# Altium PCB CM5_R6_Serigrafia_VIRTUS.PcbDoc (part 3 of 3)
Units mil, origin at the board's own origin, x right, y up, seen from the top; angles counter-clockwise.
Board outline 7086.61 x 4724.41 mil, 4 copper layers (Top Layer, GND L2, GND L3, Bottom Layer), stack 62.992 mil thick; 227 components, 122 nets, 905 pads, 209 vias.
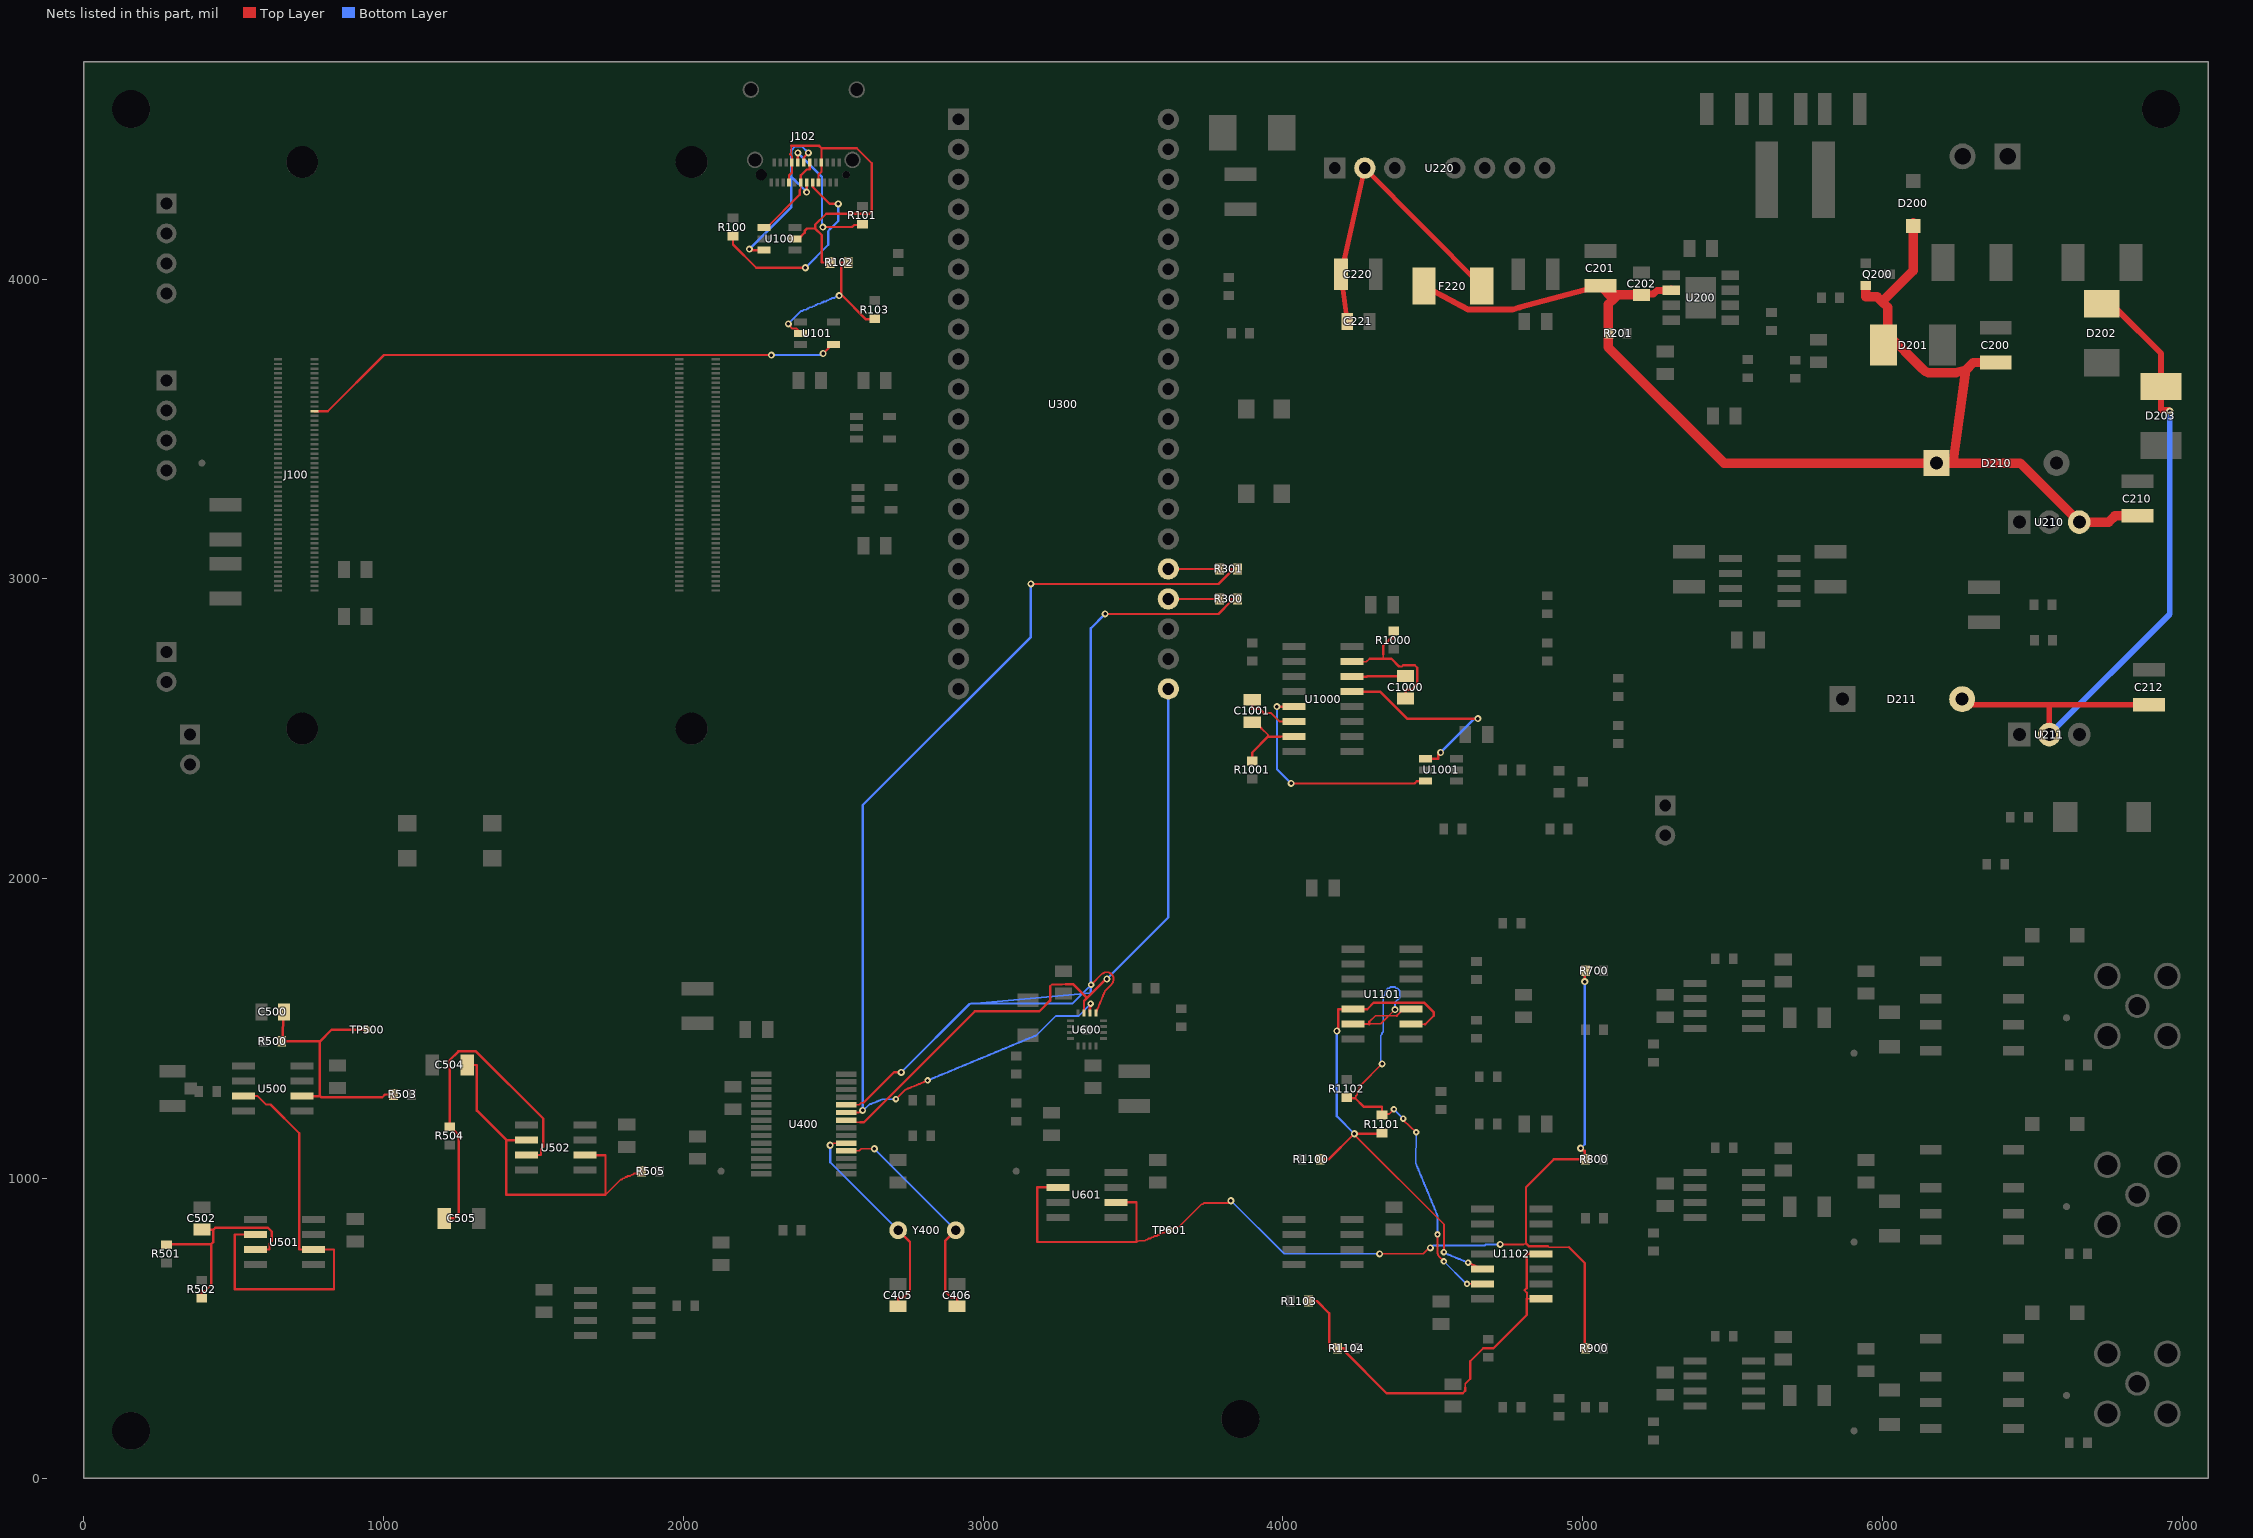
[diagram p5: the nets of this part, all layers, seen from the top]

## Via types
v1: diameter 23.62, hole 11.81, Top Layer to Bottom Layer, tented both sides, 181 vias
v2: diameter 21.65, hole 9.84, Top Layer to Bottom Layer, tented both sides, 24 vias
v3: diameter 31.5, hole 15.75, Top Layer to Bottom Layer, tented both sides, 4 vias

## Nets (pads, with @x,y where several pads share a name; then routed paths per layer and width w, separated by ;. In a path a pad name is that pad's centre, name@x,y a point inside that pad or via, vN(x,y) a via of type N, cw(c..) or ccw(c..) an arc to the next point about the centre after c; other vN are vias at no path point) (continued)
SK_B: C505.1 R504.2 U502.3 | length 1169.7
  Top Layer w5.91: U502.3@1477.36,1077.36 1524.68,1077.36 1524.68,1097.87 1532.51,1105.69
  Top Layer w7.87: C505.1@1201.77,866.14 1234.33,866.14 1250.95,882.77 1250.95,1143.73 1220.47,1174.21 1220.47,1394.46 1249.47,1423.45 1308.2,1423.45 1532.51,1199.15 1532.51,1105.69
SK_OUT: C504.2 R505.1 U502.2 U502.6 | length 1254.5
  Top Layer w5.91: 1740.16,944.88 1791.34,996.06 1795.28,996.06 1799.21,1000 1803.15,1000 1807.09,1003.94 1811.02,1003.94 1814.96,1007.87 1822.83,1007.87 1826.77,1011.81 1830.71,1011.81 1834.65,1015.75 1842.52,1015.75 1846.46,1019.68 1850.39,1019.68 R505.1@1857.28,1023.62
  Top Layer w7.87: C504.2@1278.54,1377.95 1311.1,1377.95 1311.1,1225.71 1409.45,1127.36 ; U502.2@1477.36,1127.36 1409.45,1127.36 ; U502.6@1672.24,1077.36 1740.16,1077.36 1740.16,944.88 1409.45,944.88 1409.45,1127.36
SPI_MISO: U300.21 U400.22 U600.15 | length 2243.2
  Top Layer w5.91: U400.22@2562.92,1189.88 2565.78,1187.02 2589.28,1187.02 ; 3223.5,1640.73 3229.39,1646.62 3262.74,1646.62 3264.76,1647.64 3274.61,1647.64
  Top Layer w7.87: U400.22@2543.31,1193.9 2558.91,1193.9 U400.22@2562.92,1189.88 ; 2589.28,1187.02 2602.18,1187.02 2972.52,1557.35 3188.05,1557.35 3223.5,1592.8 3223.5,1640.73 ; 3274.61,1647.64 3299.59,1647.64 3346.6,1601.63 ; U600.15@3336.61,1551.18 3336.61,1591.64 3346.6,1601.63 ; v1(3412.64,1664.81) 3409.79,1664.81 3346.6,1601.63
  Bottom Layer w7.87: v1(3412.64,1664.81) 3617.72,1869.89 U300.21@3617.72,2632.68
SPI_MOSI: R301.2 U400.23 U600.14 | length 3723.5
  Top Layer w5.91: U400.23@2543.31,1219.49 2586.69,1219.49 2593.56,1226.36 v1(2597.98,1226.36) ; v2(2708.66,1263.78) 2740.16,1295.28 2742.13,1295.28 2744.09,1297.24 2746.06,1297.24 2748.03,1299.21 2750,1299.21 2751.97,1301.18 2755.91,1301.18 2757.87,1303.15 2759.84,1303.15 2761.81,1305.12 2765.75,1305.12 2767.72,1307.09 2769.68,1307.09 2771.65,1309.06 2775.59,1309.06 2777.56,1311.02 2779.53,1311.02 2781.5,1312.99 2783.46,1312.99 2785.43,1314.96 2789.37,1314.96 2791.34,1316.93 2793.31,1316.93 2795.28,1318.9 2799.21,1318.9 2801.18,1320.87 2803.15,1320.87 2805.12,1322.83 2807.09,1322.83 2809.06,1324.8 2812.99,1324.8 v2(2814.96,1326.77) ; v2@3354.33,1576.77 3354.33,1555.12 U600.14@3356.3,1551.18 v2(3358.27,1582.68)
  Top Layer w7.87: v1(3159.29,2982.69) 3785.35,2982.69 3825.71,3023.05 3825.71,3032.68 R301.2@3851.38,3032.68
  Bottom Layer w5.91: v1(2597.98,1226.36) 2602.36,1228.35 2620.08,1246.06 2622.05,1246.06 2624.02,1248.03 2627.95,1248.03 2629.92,1250 2631.89,1250 2633.86,1251.97 2637.8,1251.97 2639.76,1253.94 2641.73,1253.94 2643.7,1255.91 2647.64,1255.91 2649.61,1257.87 2651.57,1257.87 2653.54,1259.84 2655.51,1259.84 2657.48,1261.81 2661.42,1261.81 2663.39,1263.78 v2(2708.66,1263.78) ; v2(2814.96,1326.77) 2816.93,1326.77 2818.9,1328.74 2822.83,1328.74 2824.8,1330.71 2826.77,1330.71 2828.74,1332.68 2830.71,1332.68 2832.68,1334.65 2836.61,1334.65 2838.58,1336.61 2840.55,1336.61 2842.52,1338.58 2846.46,1338.58 2848.43,1340.55 2850.39,1340.55 2852.36,1342.52 2854.33,1342.52 2856.3,1344.49 2860.24,1344.49 2862.2,1346.46 2864.17,1346.46 2866.14,1348.43 2870.08,1348.43 2872.05,1350.39 2874.02,1350.39 2875.98,1352.36 2879.92,1352.36 2881.89,1354.33 2883.86,1354.33 2885.83,1356.3 2887.8,1356.3 2889.76,1358.27 2893.7,1358.27 2895.67,1360.24 2897.64,1360.24 2899.61,1362.2 2903.54,1362.2 2905.51,1364.17 2907.48,1364.17 2909.45,1366.14 2911.42,1366.14 2913.39,1368.11 2917.32,1368.11 2919.29,1370.08 2921.26,1370.08 2923.23,1372.05 2927.17,1372.05 2929.13,1374.02 2931.1,1374.02 2933.07,1375.98 2935.04,1375.98 2937.01,1377.95 2940.94,1377.95 2942.91,1379.92 2944.88,1379.92 2946.85,1381.89 2950.79,1381.89 2952.76,1383.86 2954.72,1383.86 2956.69,1385.83 2958.66,1385.83 2960.63,1387.8 2964.57,1387.8 2966.54,1389.76 2968.5,1389.76 2970.47,1391.73 2974.41,1391.73 2976.38,1393.7 2978.35,1393.7 2980.31,1395.67 2982.28,1395.67 2984.25,1397.64 2988.19,1397.64 2990.16,1399.61 2992.13,1399.61 2994.09,1401.57 2998.03,1401.57 3000,1403.54 3001.97,1403.54 3003.94,1405.51 3007.87,1405.51 3009.84,1407.48 3011.81,1407.48 3013.78,1409.45 3015.75,1409.45 3017.72,1411.42 3021.65,1411.42 3023.62,1413.39 3025.59,1413.39 3027.56,1415.35 3031.5,1415.35 3033.46,1417.32 3035.43,1417.32 3037.4,1419.29 3039.37,1419.29 3041.34,1421.26 3045.28,1421.26 3047.24,1423.23 3049.21,1423.23 3051.18,1425.2 3055.12,1425.2 3057.09,1427.17 3059.06,1427.17 3061.02,1429.13 3062.99,1429.13 3064.96,1431.1 3068.9,1431.1 3070.87,1433.07 3072.83,1433.07 3074.8,1435.04 3078.74,1435.04 3080.71,1437.01 3082.68,1437.01 3084.65,1438.98 3086.61,1438.98 3088.58,1440.94 3092.52,1440.94 3094.49,1442.91 3096.46,1442.91 3098.43,1444.88 3102.36,1444.88 3104.33,1446.85 3106.3,1446.85 3108.27,1448.82 3110.24,1448.82 3112.2,1450.79 3116.14,1450.79 3118.11,1452.76 3120.08,1452.76 3122.05,1454.72 3125.98,1454.72 3127.95,1456.69 3129.92,1456.69 3131.89,1458.66 3135.83,1458.66 3137.8,1460.63 3139.76,1460.63 3141.73,1462.6 3143.7,1462.6 3145.67,1464.57 3149.61,1464.57 3151.57,1466.54 3153.54,1466.54 3155.51,1468.5 3159.45,1468.5 3161.42,1470.47 3163.39,1470.47 3165.35,1472.44 3167.32,1472.44 3169.29,1474.41 3173.23,1474.41 3175.2,1476.38 3177.17,1476.38 3242.13,1541.34 3318.9,1541.34 v2@3354.33,1576.77
  Bottom Layer w7.87: v1(2597.98,1226.36) 2597.98,2244.47 3159.29,2805.78 v1(3159.29,2982.69)
SPI_MOSI_RAW: R301.1 U300.25 | length 168.7
  Top Layer w7.87: U300.25@3617.72,3032.68 R301.1@3786.42,3032.68
SPI_SCLK: R300.2 U400.24 U600.13 | length 3388.8
  Top Layer w5.91: U400.24@2543.31,1245.08 2586.69,1245.08 2593.56,1251.95 2601.04,1251.95 ; v2(3360.24,1645.67) 3397.64,1683.07 3399.61,1683.07 3401.57,1685.04 3403.54,1685.04 3405.51,1687.01 3419.29,1687.01 3421.26,1685.04 3423.23,1685.04 3425.2,1683.07 3427.17,1683.07 3431.1,1679.13 3431.1,1677.17 3433.07,1675.2 3433.07,1673.23 3435.04,1671.26 3435.04,1659.45 3433.07,1657.48 3433.07,1653.54 3429.13,1649.61 3429.13,1647.64 3405.51,1624.02 3405.51,1620.08 3403.54,1618.11 3403.54,1616.14 3401.57,1614.17 3401.57,1612.2 3399.61,1610.24 3399.61,1606.3 3397.64,1604.33 3397.64,1602.36 3395.67,1600.39 3395.67,1596.46 3393.7,1594.49 3393.7,1592.52 3391.73,1590.55 3391.73,1588.58 3389.76,1586.61 3389.76,1582.68 3387.8,1580.71 3387.8,1578.74 3385.83,1576.77 3385.83,1572.83 3383.86,1570.87 3383.86,1568.9 3381.89,1566.93 3381.89,1564.96 3379.92,1562.99 3379.92,1559.06 3377.95,1557.09 3377.95,1555.12 U600.13@3375.98,1551.18
  Top Layer w7.87: 2601.04,1251.95 2702.52,1353.43 v1(2726.75,1353.43) ; v1(3406.77,2882.61) 3785.28,2882.61 3825.71,2923.05 3825.71,2932.68 R300.2@3851.38,2932.68
  Bottom Layer w5.91: 2954.79,1581.47 2958.66,1582.68 3297.24,1582.68 v2(3360.24,1645.67)
  Bottom Layer w7.87: v1(2726.75,1353.43) 2954.79,1581.47 3359.36,1618.11 3359.36,2835.2 v1(3406.77,2882.61)
SPI_SCLK_RAW: R300.1 U300.24 | length 168.7
  Top Layer w7.87: U300.24@3617.72,2932.68 R300.1@3786.42,2932.68
TIA_OUT: C500.2 R500.2 R503.1 TP500.1 U500.6 | length 888.3
  Top Layer w7.87: C500.2@667.32,1555.12 662.4,1456.69 787.4,1456.69 ; U500.6@727.36,1274.21 787.4,1274.21 ; TP500.1@944.88,1496.06 826.77,1496.06 787.4,1456.69 ; R503.1@1030.51,1279.53 1004.85,1279.53 995.69,1270.37 791.24,1270.37 787.4,1274.21 ; 787.4,1274.21 787.4,1456.69
USB_CC1: J102.A5 R100.1 | length 681.4
  Top Layer w7.87: R100.1@2165.35,4140.75 2165.35,4115.08 2242.91,4037.53 v1(2407.14,4037.53) ; J102.A5@2431.1,4322.05 2431.1,4307.91 2488.45,4250.56 v1(2516.65,4250.56)
  Bottom Layer w5.91: 2483.59,4158.53 2483.59,4160.81 2488.72,4165.94
  Bottom Layer w7.87: v1(2407.14,4037.53) 2483.59,4113.98 2483.59,4158.53 ; 2488.72,4165.94 2516.65,4193.86 v1(2516.65,4250.56)
USB_CC2: J102.B5 R101.1 | length 455.4
  Top Layer w7.87: J102.B5@2381.89,4388.98 v1(2381.89,4420.67) ; v1(2465.43,4173.3) 2562.98,4173.3 2569.81,4180.12 R101.1@2598.43,4180.12
  Bottom Layer w7.87: v1(2381.89,4420.67) 2462.47,4340.09 2462.47,4170.33 v1(2465.43,4173.3)
USB_DN_EXT: J102.A7 J102.B7 U100.1 | length 282.9
  Top Layer w5.91: 2387.81,4297.15 2391.73,4301.07 J102.A7@2391.73,4322.05
  Top Layer w7.87: U100.1@2278.05,4171.26 2387.81,4281.02 2387.81,4297.15 ; J102.A7@2391.73,4322.05 2391.73,4345.74 2411.27,4365.28 2421.26,4365.28 J102.B7@2421.26,4388.98
USB_DP_EXT: J102.A6 J102.B6 U100.3 | length 662.5
  Top Layer w7.87: v1(2220.34,4099.68) 2223.56,4096.46 2242.05,4096.46 U100.3@2278.05,4096.46 ; J102.B6@2401.57,4388.98 2401.57,4405.01 v1(2417.19,4420.62) ; v1(2411.42,4290.11) J102.A6@2411.42,4322.05
  Bottom Layer w7.87: v1(2220.34,4099.68) 2359.35,4238.7 2359.35,4342.18 ; v1(2411.42,4290.11) 2359.35,4342.18 ; v1(2417.19,4420.62) 2394.81,4443 2373.41,4443 2359.35,4428.95 2359.35,4342.18
USB_VBUS: J102.A4 J102.A9 J102.B4 J102.B9 R102.1 U100.5 | length 1158
  Top Layer w5.91: 2356.18,4417.15 2360.22,4421.19 2360.22,4444.03 ; 2358.28,4413.64 2362.2,4409.72 J102.B4@2362.2,4388.98
  Top Layer w7.87: J102.A9@2352.36,4322.05 2352.36,4345.74 2362.2,4355.59 2362.2,4365.28 J102.B4@2362.2,4388.98 ; 2356.18,4417.15 2358.28,4415.04 2358.28,4413.64 ; 2360.22,4444.03 2452.79,4444.03 2460.63,4436.19 ; U100.5@2367.62,4133.86 2383.76,4133.86 2404.45,4154.55 2404.45,4160.29 2412.57,4168.41 2439.58,4168.41 ; J102.A4@2450.79,4322.05 2450.79,4348.11 2460.63,4357.96 J102.B9@2460.63,4388.98 2460.63,4412.67 2460.63,4436.19 ; R102.1@2487.2,4055.12 2461.54,4055.12 2461.54,4146.45 2439.58,4168.41 ; 2439.58,4168.41 2439.58,4180.79 2476.71,4217.92 2619.77,4217.92 2628.45,4226.6 2628.45,4386.04 2578.3,4436.19 2460.63,4436.19
USB_VBUS_OK: J100.24 U101.4 | length 1814.8
  Top Layer w7.87: J100.24@769.29,3559.05 813.9,3559.06 1001.22,3746.38 v1(2293.57,3746.38) ; v1(2466.4,3751.5) 2485.73,3770.83 U101.4@2485.73,3781.5
  Bottom Layer w7.87: v1(2293.57,3746.38) 2461.27,3746.38 v1(2466.4,3751.5)
USB_VS_IN: R102.2 R103.1 U101.2 | length 547.4
  Top Layer w5.91: v1(2350.39,3850.39) 2358.27,3842.52 2358.27,3838.58 2362.2,3834.65 2377.95,3834.65 U101.2@2389.76,3822.83 ; v1(2519.68,3944.88) v1@2526.5,3947.83
  Top Layer w7.87: R102.2@2552.17,4055.12 2526.5,4055.12 2526.5,3947.83 2609.18,3865.16 R103.1@2637.8,3865.16
  Bottom Layer w5.91: v1(2350.39,3850.39) 2393.7,3893.7 2397.64,3893.7 2401.57,3897.64 2409.45,3897.64 2413.39,3901.57 2417.32,3901.57 2421.26,3905.51 2429.13,3905.51 2433.07,3909.45 2437.01,3909.45 2440.94,3913.39 2444.88,3913.39 2448.82,3917.32 2456.69,3917.32 2460.63,3921.26 2464.57,3921.26 2468.5,3925.2 2476.38,3925.2 2480.31,3929.13 2484.25,3929.13 2488.19,3933.07 2492.13,3933.07 2496.06,3937.01 2503.94,3937.01 2507.87,3940.94 2511.81,3940.94 2515.75,3944.88 v1(2519.68,3944.88)
VDARK: U500.3 U501.2 U501.6 | length 1455.1
  Top Layer w5.91: U500.3@532.48,1274.21 579.8,1274.21 608.13,1245.88 623.02,1245.88
  Top Layer w7.87: U501.2@571.85,812.4 503.94,812.4 503.94,629.92 834.65,629.92 834.65,762.4 U501.6@766.73,762.4 718.43,762.4 718.43,1150.47 623.02,1245.88
VDARK_DIV: C502.1 R501.2 R502.1 U501.3 | length 754
  Top Layer w5.91: U501.3@571.85,762.4 619.17,762.4 619.17,782.91 627,790.73
  Top Layer w7.87: R501.2@275.59,780.51 304.21,780.51 424.95,780.51 ; R502.1@393.7,597.44 393.7,623.11 403.33,623.11 424.95,644.72 424.95,780.51 ; C502.1@393.7,828.74 432.16,828.74 ; 627,790.73 627,822.28 614.04,835.24 438.66,835.24 432.16,828.74 ; 424.95,780.51 432.16,787.72 432.16,828.74
VHI: R1100.2 R1101.1 U1101.5 U1101.9 U1102.5 | length 1790.5
  Top Layer w5.91: v1(4238.27,1148.62) 4240.16,1143.7 4537.4,846.46 v2(4537.4,753.94) ; U1101.9@4428.15,1514.17 4472.48,1514.17 ; 4475.47,1514.17 4503.78,1542.5 ; v2(4618.11,718.5) 4620.08,716.54 4624.02,716.54 4625.98,714.57 4627.95,714.57 4629.92,712.6 4631.89,712.6 4633.86,710.63 4637.8,710.63 4639.76,708.66 4641.73,708.66 4643.7,706.69 4647.64,706.69 4649.61,704.72 4651.57,704.72 4653.54,702.76 4655.51,702.76 4657.48,700.79 4661.42,700.79 4663.39,698.82 U1102.5@4666.34,698.03
  Top Layer w7.87: R1100.2@4126.97,1062.99 4152.64,1062.99 v1(4238.27,1148.62) R1101.1@4330.71,1148.62 ; v1(4180,1491.32) 4184.96,1496.28 4184.96,1564.17 U1101.5@4233.27,1564.17 4281.57,1564.17 4303.31,1585.91 4471.18,1585.91 4503.78,1553.31 4503.78,1542.5 ; 4472.48,1514.17 4475.47,1514.17
  Bottom Layer w5.91: v2(4537.4,753.94) 4541.34,750 4543.31,750 4545.28,748.03 4547.24,748.03 4549.21,746.06 4551.18,746.06 4553.15,744.09 4557.09,744.09 4559.06,742.13 4561.02,742.13 4562.99,740.16 4566.93,740.16 4568.9,738.19 4570.87,738.19 4572.83,736.22 4574.8,736.22 4576.77,734.25 4580.71,734.25 4582.68,732.28 4584.65,732.28 4586.61,730.31 4590.55,730.31 4592.52,728.35 4594.49,728.35 4596.46,726.38 4600.39,726.38 4602.36,724.41 4604.33,724.41 4606.3,722.44 4608.27,722.44 4610.24,720.47 4614.17,720.47 4616.14,718.5 v2(4618.11,718.5)
  Bottom Layer w7.87: v1(4180,1491.32) 4180,1206.89 v1(4238.27,1148.62)
VIN_DC: C220.1 C221.1 F220.2 U220.2 | length 1076.3
  Top Layer w15.75: C221.1@4214.57,3858.27 C220.1@4193.9,4015.75 U220.2@4273.23,4370.08 F220.2@4663.58,3976.38
VIN_N: C212.1 D202.2 D203.2 D211.2 U211.2 | length 2453.5
  Top Layer w19.68: D211.2@6266.14,2598.43 6284.84,2579.72 6556.69,2579.72 ; U211.2@6556.69,2480.31 6556.69,2579.72 ; D202.2@6732.28,3897.64 6783.54,3897.64 6929.13,3752.04 6929.13,3627.95 6929.13,3562.92 6955.12,3562.92 v1(6958.5,3559.53) ; C212.1@6889.76,2579.72 6556.69,2579.72
  Bottom Layer w19.68: U211.2@6556.69,2480.31 6958.5,2882.12 v1(6958.5,3559.53)
VIN_P: C200.1 C201.1 C202.1 C210.1 D200.1 D201.1 D210.1 F220.1 Q200.2 R201.1 U200.2 U210.3 | length 4418.9
  Top Layer w19.68: F220.1@4470.28,3976.38 4619.88,3897.64 4765.55,3897.64 4789.17,3905.51 C201.1@5059.06,3977.36
  Top Layer w23.62: C202.1@5196.85,3949.46 5235.43,3949.46 5247.95,3962.01 U200.2@5295.37,3962.01
  Top Layer w31.5: C201.1@5059.06,3977.36 5103.15,3933.26 ; C202.1@5196.85,3949.46 C202.1@5196.85,3946.85 5116.73,3946.85 5103.15,3933.26 ; Q200.2@5944.88,3978.35 5944.88,3940.87 5982.36,3940.87 5999.02,3924.21 ; D201.1@6017.72,3779.53 D201.1@6017.72,3815.85 ; D200.1@6102.36,4187.01 6102.36,4027.55 5999.02,3924.21 ; C200.1@6377.95,3721.46 6303.07,3721.46 6278.43,3696.81 ; C210.1@6850.39,3209.65 6775.51,3209.65 6754.84,3188.98 U210.3@6656.69,3188.98 6459.84,3385.83 6235.67,3385.83 ; 5103.15,3933.26 5085.63,3915.74 5085.63,3818.9 5085.63,3771.72 5471.54,3385.83 D210.1@6181.1,3385.83 ; 5999.02,3924.21 6017.72,3905.51 6017.72,3846.53 D201.1@6017.72,3815.85 ; D201.1@6017.72,3815.85 6128.74,3704.83 6142.52,3691.89 6153.35,3687.95 6245.87,3687.95 6278.43,3696.81 ; D210.1@6181.1,3385.83 6235.67,3385.83 ; D210.1@6181.1,3385.83 6235.67,3385.83 ; 6235.67,3385.83 6278.43,3696.81
VLO: R1101.2 R1102.1 U1101.6 U1101.10 U1102.6 | length 1850.4
  Top Layer w5.91: 4241.22,1266.73 4244.09,1275.59 4248.03,1279.53 4248.03,1287.4 4251.97,1291.34 4251.97,1295.28 4255.91,1299.21 4255.91,1303.15 4259.84,1307.09 4259.84,1311.02 v1(4330.71,1381.89) ; 4288.03,1514.17 4280.59,1514.17 U1101.6@4233.27,1514.17 4240.16,1515.75 4326.77,1515.75 v1(4374.02,1562.99) ; 4288.03,1521.62 4308.9,1542.5 4379.92,1542.5 ; R1101.2@4330.71,1213.58 4334.65,1214.57 4354.33,1214.57 v2(4370.08,1230.31) ; v2(4401.57,1198.82) 4401.57,1192.91 v2(4444.88,1153.54) ; v2(4515.75,812.99) 4515.75,748.03 4517.72,746.06 4517.72,744.09 4519.69,742.13 4519.69,740.16 v2(4537.4,722.44) ; v2(4614.17,648.03) U1102.6@4666.34,648.03
  Top Layer w7.87: R1102.1@4212.6,1266.73 4241.22,1266.73 4268.7,1239.25 4330.71,1239.25 R1101.2@4330.71,1213.58 ; 4288.03,1514.17 4288.03,1521.62 ; 4379.92,1542.5 4401.57,1564.17 U1101.10@4428.15,1564.17
  Bottom Layer w5.91: v1(4330.71,1381.89) 4326.77,1385.83 4326.77,1476.38 4330.71,1480.31 4330.71,1484.25 4334.65,1488.19 4334.65,1606.3 4342.52,1614.17 4342.52,1622.05 4346.46,1625.98 4346.46,1629.92 4350.39,1633.86 4354.33,1633.86 4358.27,1637.8 4374.02,1637.8 4377.95,1633.86 4381.89,1633.86 4389.76,1625.98 4389.76,1602.36 4374.02,1586.61 v1(4374.02,1562.99) ; v2(4370.08,1230.31) v2(4401.57,1198.82) ; v2(4444.88,1153.54) 4442.91,1049.21 4444.88,1047.24 4444.88,1045.28 4446.85,1043.31 4446.85,1039.37 4448.82,1037.4 4448.82,1035.43 4450.79,1033.46 4450.79,1031.5 4452.76,1029.53 4452.76,1025.59 4454.72,1023.62 4454.72,1021.65 4456.69,1019.68 4456.69,1015.75 4458.66,1013.78 4458.66,1011.81 4460.63,1009.84 4460.63,1007.87 4462.6,1005.91 4462.6,1001.97 4464.57,1000 4464.57,998.03 4466.54,996.06 4466.54,992.13 4468.5,990.16 4468.5,988.19 4470.47,986.22 4470.47,982.28 4472.44,980.31 4472.44,978.35 4474.41,976.38 4474.41,974.41 4476.38,972.44 4476.38,968.5 4478.35,966.54 4478.35,964.57 4480.31,962.6 4480.31,958.66 4482.28,956.69 4482.28,954.72 4484.25,952.76 4484.25,950.79 4486.22,948.82 4486.22,944.88 4488.19,942.91 4488.19,940.94 4490.16,938.98 4490.16,935.04 4492.13,933.07 4492.13,931.1 4494.09,929.13 4494.09,927.17 4496.06,925.2 4496.06,921.26 4498.03,919.29 4498.03,917.32 4500,915.35 4500,911.42 4501.97,909.45 4501.97,907.48 4503.94,905.51 4503.94,903.54 4505.91,901.57 4505.91,897.64 4507.87,895.67 4507.87,893.7 4509.84,891.73 4509.84,887.8 4511.81,885.83 4511.81,883.86 4513.78,881.89 4513.78,877.95 4515.75,875.98 v2(4515.75,812.99) ; v2(4537.4,722.44) 4608.27,651.57 v2(4614.17,648.03)
VMID_DAC: R700.1 R800.1 R900.1 TP601.1 U601.2 U601.6 | length 3795.9
  Top Layer w5.91: 3511.81,787.4 3519.68,791.34 3539.37,791.34 3543.31,795.28 3547.24,795.28 3551.18,799.21 3559.06,799.21 3562.99,803.15 3566.93,803.15 3570.87,807.09 3578.74,807.09 3582.68,811.02 3586.61,811.02 3590.55,814.96 3594.49,814.96 3598.43,818.9 3606.3,818.9 3610.24,822.83 3614.17,822.83 TP601.1@3622.05,826.77 3629.92,830.71 3633.86,830.71 3637.8,834.65 3645.67,834.65 3649.61,838.58 3653.54,838.58 3728.35,913.39 3732.28,913.39 3736.22,917.32 3818.9,917.32 v1(3826.77,925.2) ; v1(4322.83,748.03) 4468.5,748.03 4488.19,767.72 v1(4492.13,767.72) ; v1(4724.41,779.53) 4803.15,779.53 4810.83,782.76 ; 4884.53,773.03 4887.83,769.68 4954.41,769.68
  Top Layer w7.87: U601.2@3249.02,969.88 3181.1,969.88 3181.1,787.4 3511.81,787.4 3511.81,919.88 U601.6@3443.9,919.88 ; 4884.53,773.03 4820.55,773.03 4810.83,782.76 4810.83,970.1 4903.74,1062.99 5006.89,1062.99 5006.89,1091.61 5001.84,1091.61 v1(4993.31,1100.13) ; 4954.41,769.68 5006.89,717.24 R900.1@5006.89,433.07 ; v1(5006.89,1655.97) R700.1@5006.89,1692.91
  Bottom Layer w5.91: v1(3826.77,925.2) 4003.94,748.03 v1(4322.83,748.03) ; v1(4492.13,767.72) 4500,775.59 4673.23,775.59 4677.17,779.53 v1(4724.41,779.53)
  Bottom Layer w7.87: v1(4993.31,1100.13) 5006.89,1113.71 v1(5006.89,1655.97)
VRAIL: R1103.2 R1104.1 U1102.8 U1102.11 | length 1388.4
  Top Layer w5.91: 4608.19,301.3 4608.19,315.08 4624.92,331.85 ; 4806.06,626.38 4813.9,618.54 4813.9,598.03 U1102.8@4861.22,598.03
  Top Layer w7.87: R1103.2@4087.6,590.55 4113.27,590.55 4154.45,549.37 4154.45,433.07 4180.12,433.07 4205.79,433.07 4205.79,423.46 4346.14,283.11 4599.72,283.11 4608.19,291.54 4608.19,301.3 ; 4624.92,331.85 4624.92,389.49 4668.5,433.07 4702.32,433.07 4813.9,544.65 4813.9,598.03 ; 4806.06,626.38 4812.91,633.19 4812.91,748.03 U1102.11@4861.22,748.03
WD_C1: C1000.2 U1000.14 | length 178.9
  Top Layer w7.87: U1000.14@4231.3,2673.43 4279.61,2673.43 4281.38,2675.2 C1000.2@4409.45,2675.2
WD_C2: C1001.2 U1000.6 | length 186.4
  Top Layer w5.91: 3936.04,2551.76 3960.79,2551.76 3989.09,2523.43 U1000.6@4036.42,2523.43
  Top Layer w7.87: C1001.2@3897.64,2596.46 3897.64,2566.85 3920.94,2566.85 3936.04,2551.76
WD_CM5: U1000.5 U1001.3 | length 790.4
  Top Layer w7.87: v1(3980.24,2573.43) 3988.11,2573.43 U1000.5@4036.42,2573.43 ; v1(4027.64,2317.17) 4439.13,2317.17 4446.77,2324.8 U1001.3@4482.76,2324.8
  Bottom Layer w7.87: v1(3980.24,2573.43) 3980.24,2364.61 v1(4027.64,2317.17)
WD_MCU: U1000.13 U1001.1 | length 687
  Top Layer w7.87: U1000.13@4231.3,2623.43 4324.17,2623.43 4414.13,2533.46 v1(4650.24,2533.46) ; U1001.1@4482.76,2399.61 4518.78,2399.61 4518.78,2413.09 v1(4526.18,2420.48)
  Bottom Layer w7.87: v1(4526.18,2420.48) 4639.13,2533.46 v1(4650.24,2533.46)
WD_R1: C1000.1 R1000.2 U1000.15 | length 480.9
  Top Layer w5.91: U1000.15@4231.3,2723.43 4278.62,2723.43 4288.94,2733.76 ; 4334.61,2733.76 4334.61,2747.82 ; 4387.72,2707.6 4397.48,2707.6 4401.5,2711.64
  Top Layer w7.87: 4288.94,2733.76 4334.61,2733.76 4361.54,2733.76 4387.72,2707.6 ; 4334.61,2747.82 4334.61,2776.26 4360.47,2802.09 4370.08,2802.09 R1000.2@4370.08,2827.76 ; 4401.5,2711.64 4439.69,2711.64 4447.91,2703.4 4447.91,2649.96 4427.95,2630 4409.45,2630 C1000.1@4409.45,2600.39
WD_R2: C1001.1 R1001.2 U1000.7 | length 262.7
  Top Layer w5.91: 3927.87,2501.76 3950.71,2478.91 3950.71,2473.43 ; 3992.09,2473.43 U1000.7@4036.42,2473.43
  Top Layer w7.87: R1001.2@3897.64,2394.68 3897.64,2420.35 3950.71,2473.43 3992.09,2473.43 ; C1001.1@3897.64,2521.65 3907.97,2521.65 3927.87,2501.76
XTAL1: C405.1 U400.19 Y400.1 | length 731.3
  Top Layer w5.91: v1(2489.81,1110.25) 2493.05,1110.25 2499.93,1117.13 U400.19@2543.31,1117.13
  Top Layer w7.87: C405.1@2716.54,572.83 2716.54,602.44 2735.04,602.44 2756.14,623.54 2756.14,787.17 Y400.1@2716.54,826.77
  Bottom Layer w7.87: v1(2489.81,1110.25) 2489.81,1053.49 Y400.1@2716.54,826.77
XTAL2: C406.1 U400.18 Y400.2 | length 776.8
  Top Layer w5.91: U400.18@2543.31,1091.54 2586.69,1091.54 2593.56,1098.41 v1(2637.02,1098.41)
  Top Layer w7.87: Y400.2@2908.66,826.77 2873.19,791.3 2873.19,624.13 2894.89,602.44 2913.39,602.44 C406.1@2913.39,572.83
  Bottom Layer w7.87: v1(2637.02,1098.41) Y400.2@2908.66,826.77
pads on no net: H1. H2. H3. H4. H5. H6. H7. H8. J100.3 J100.4 J100.5 J100.6 J100.9 J100.10 J100.11 J100.12 J100.15 J100.17 J100.18 J100.20 J100.25 J100.26 J100.27 J100.28 J100.29 J100.30 J100.31 J100.34 J100.35 J100.36 J100.37 J100.38 J100.39 J100.40 J100.41 J100.44 J100.45 J100.46 J100.47 J100.48 J100.49 J100.57 J100.61 J100.62 J100.63 J100.64 J100.67 J100.68 J100.69 J100.70 J100.72 J100.73 J100.75 J100.76 J100.80 J100.82 J100.88 J100.89 J100.90 J100.91 J100.94 J100.95 J100.96 J100.97 J100.100 J101.1 J101.2 J101.4 J101.6 J101.9 J101.10 J101.11 J101.12 J101.15 J101.16 J101.17 J101.18 J101.21 J101.22 J101.23 J101.24 J101.27 J101.28 J101.29 J101.30 J101.33 J101.34 J101.35 J101.36 J101.39 J101.40 J101.41 J101.42 J101.43 J101.45 J101.46 J101.47 J101.48 J101.49 J101.51 J101.52 J101.53 J101.54 J101.57 J101.58 J101.59 J101.60 J101.63 J101.64 J101.65 J101.66 J101.69 J101.70 J101.71 J101.72 J101.75 J101.76 J101.77 J101.78 J101.81 J101.82 J101.83 J101.84 J101.87 J101.88 J101.89 J101.90 J101.93 J101.94 J101.95 J101.96 J101.99 J101.100 J102. J102.A2 J102.A3 J102.A8 J102.A10 J102.A11 J102.B2 J102.B3 J102.B8 J102.B10 J102.B11 K700.5 K700.6 K700.7 K800.5 K800.6 K800.7 K900.5 K900.6 K900.7 U101.1 U220.3 U220.5 U220.8 U300.11 U300.12 U300.14 U300.15 U300.16 U300.17 U300.19 U300.20 U300.31 U300.32 U300.34 U300.35 U300.37 U300.40 U301.1 U302.1 U400.10 U400.11 U400.12 U400.13 U400.25 U400.26 U400.27 U400.28 U401.1 U401.3 U401.5 U401.7 U401.8 U500.1 U500.5 U500.8 U501.1 U501.5 U501.8 U502.1 U502.5 U502.8 U601.1 U601.5 U601.8 U700.1 U700.5 U700.8 U800.1 U800.5 U800.8 U900.1 U900.5 U900.8 U1000.4 U1000.12 U1100.1 U1100.5 U1100.8

## Polygon pours and split planes (outlines as drawn)
GND on GND L2 "GND_L2" (solid, pour order 1): 19.68,19.68 7066.93,19.68 7066.93,4704.72 19.68,4704.72
GND on GND L3 "GND_L3" (solid, pour order 2): 19.68,19.68 7066.93,19.68 7066.93,4704.72 19.68,4704.72

## Keep-outs
Top Layer:
  region: 848.62,2500 846.79,2479.11 841.37,2458.86 832.51,2439.86 820.48,2422.69 805.66,2407.86 788.48,2395.84 769.48,2386.98 749.23,2381.55 728.35,2379.72 707.46,2381.55 687.21,2386.98 668.21,2395.84 651.03,2407.86 636.21,2422.69 624.18,2439.86 615.32,2458.86 609.9,2479.11 608.07,2500 609.9,2520.89 615.32,2541.14 624.18,2560.14 636.21,2577.31 651.03,2592.14 668.21,2604.16 687.21,2613.02 707.46,2618.45 728.35,2620.28 749.23,2618.45 769.48,2613.02 788.48,2604.16 805.66,2592.14 820.48,2577.31 832.51,2560.14 841.37,2541.14 846.79,2520.89
  region: 295.47,4566.93 293.38,4542.97 287.15,4519.73 276.99,4497.93 263.19,4478.23 246.18,4461.22 226.48,4447.42 204.68,4437.26 181.44,4431.03 157.48,4428.94 133.52,4431.03 110.28,4437.26 88.48,4447.42 68.78,4461.22 51.77,4478.23 37.98,4497.93 27.81,4519.73 21.58,4542.97 19.49,4566.93 21.58,4590.89 27.81,4614.13 37.98,4635.93 51.77,4655.63 68.78,4672.64 88.48,4686.43 110.28,4696.6 133.52,4702.82 157.48,4704.92 181.44,4702.82 204.68,4696.6 226.48,4686.43 246.18,4672.64 263.19,4655.63 276.99,4635.93 287.15,4614.13 293.38,4590.89
  region: 905.51,4704.72 1732.28,4704.72 1732.28,4094.49 905.51,4094.49
  region: 2147.83,2500 2146.01,2479.11 2140.58,2458.86 2131.72,2439.86 2119.7,2422.69 2104.87,2407.86 2087.7,2395.84 2068.7,2386.98 2048.44,2381.55 2027.56,2379.72 2006.67,2381.55 1986.42,2386.98 1967.42,2395.84 1950.25,2407.86 1935.42,2422.69 1923.4,2439.86 1914.54,2458.86 1909.11,2479.11 1907.28,2500 1909.11,2520.89 1914.54,2541.14 1923.4,2560.14 1935.42,2577.31 1950.25,2592.14 1967.42,2604.16 1986.42,2613.02 2006.67,2618.45 2027.56,2620.28 2048.44,2618.45 2068.7,2613.02 2087.7,2604.16 2104.87,2592.14 2119.7,2577.31 2131.72,2560.14 2140.58,2541.14 2146.01,2520.89
  region: 3996.26,196.85 3994.16,172.89 3987.94,149.65 3977.77,127.85 3963.98,108.15 3946.97,91.14 3927.26,77.35 3905.46,67.18 3882.23,60.95 3858.27,58.86 3834.31,60.95 3811.07,67.18 3789.27,77.35 3769.57,91.14 3752.56,108.15 3738.76,127.85 3728.6,149.65 3722.37,172.89 3720.28,196.85 3722.37,220.81 3728.6,244.05 3738.76,265.85 3752.56,285.55 3769.57,302.56 3789.27,316.36 3811.07,326.52 3834.31,332.75 3858.27,334.84 3882.23,332.75 3905.46,326.52 3927.26,316.36 3946.97,302.56 3963.98,285.55 3977.77,265.85 3987.94,244.05 3994.16,220.81
  region: 295.47,157.48 293.38,133.52 287.15,110.28 276.99,88.48 263.19,68.78 246.18,51.77 226.48,37.98 204.68,27.81 181.44,21.58 157.48,19.49 133.52,21.58 110.28,27.81 88.48,37.98 68.78,51.77 51.77,68.78 37.98,88.48 27.81,110.28 21.58,133.52 19.49,157.48 21.58,181.44 27.81,204.68 37.98,226.48 51.77,246.18 68.78,263.19 88.48,276.99 110.28,287.15 133.52,293.38 157.48,295.47 181.44,293.38 204.68,287.15 226.48,276.99 246.18,263.19 263.19,246.18 276.99,226.48 287.15,204.68 293.38,181.44
  region: 7067.13,4566.93 7065.03,4542.97 7058.8,4519.73 7048.64,4497.93 7034.84,4478.23 7017.83,4461.22 6998.13,4447.42 6976.33,4437.26 6953.1,4431.03 6929.13,4428.94 6905.17,4431.03 6881.94,4437.26 6860.14,4447.42 6840.43,4461.22 6823.43,4478.23 6809.63,4497.93 6799.46,4519.73 6793.24,4542.97 6791.14,4566.93 6793.24,4590.89 6799.46,4614.13 6809.63,4635.93 6823.43,4655.63 6840.43,4672.64 6860.14,4686.43 6881.94,4696.6 6905.17,4702.82 6929.13,4704.92 6953.1,4702.82 6976.33,4696.6 6998.13,4686.43 7017.83,4672.64 7034.84,4655.63 7048.64,4635.93 7058.8,4614.13 7065.03,4590.89
  region: 2147.83,4389.76 2146.01,4368.88 2140.58,4348.63 2131.72,4329.63 2119.7,4312.45 2104.87,4297.63 2087.7,4285.6 2068.7,4276.74 2048.44,4271.32 2027.56,4269.49 2006.67,4271.32 1986.42,4276.74 1967.42,4285.6 1950.25,4297.63 1935.42,4312.45 1923.4,4329.63 1914.54,4348.63 1909.11,4368.88 1907.28,4389.76 1909.11,4410.65 1914.54,4430.9 1923.4,4449.9 1935.42,4467.08 1950.25,4481.9 1967.42,4493.93 1986.42,4502.79 2006.67,4508.21 2027.56,4510.04 2048.44,4508.21 2068.7,4502.79 2087.7,4493.93 2104.87,4481.9 2119.7,4467.08 2131.72,4449.9 2140.58,4430.9 2146.01,4410.65
  region: 848.62,4389.76 846.79,4368.88 841.37,4348.63 832.51,4329.63 820.48,4312.45 805.66,4297.63 788.48,4285.6 769.48,4276.74 749.23,4271.32 728.35,4269.49 707.46,4271.32 687.21,4276.74 668.21,4285.6 651.03,4297.63 636.21,4312.45 624.18,4329.63 615.32,4348.63 609.9,4368.88 608.07,4389.76 609.9,4410.65 615.32,4430.9 624.18,4449.9 636.21,4467.08 651.03,4481.9 668.21,4493.93 687.21,4502.79 707.46,4508.21 728.35,4510.04 749.23,4508.21 769.48,4502.79 788.48,4493.93 805.66,4481.9 820.48,4467.08 832.51,4449.9 841.37,4430.9 846.79,4410.65
GND L2:
  region: 848.62,2500 846.79,2479.11 841.37,2458.86 832.51,2439.86 820.48,2422.69 805.66,2407.86 788.48,2395.84 769.48,2386.98 749.23,2381.55 728.35,2379.72 707.46,2381.55 687.21,2386.98 668.21,2395.84 651.03,2407.86 636.21,2422.69 624.18,2439.86 615.32,2458.86 609.9,2479.11 608.07,2500 609.9,2520.89 615.32,2541.14 624.18,2560.14 636.21,2577.31 651.03,2592.14 668.21,2604.16 687.21,2613.02 707.46,2618.45 728.35,2620.28 749.23,2618.45 769.48,2613.02 788.48,2604.16 805.66,2592.14 820.48,2577.31 832.51,2560.14 841.37,2541.14 846.79,2520.89
  region: 295.47,4566.93 293.38,4542.97 287.15,4519.73 276.99,4497.93 263.19,4478.23 246.18,4461.22 226.48,4447.42 204.68,4437.26 181.44,4431.03 157.48,4428.94 133.52,4431.03 110.28,4437.26 88.48,4447.42 68.78,4461.22 51.77,4478.23 37.98,4497.93 27.81,4519.73 21.58,4542.97 19.49,4566.93 21.58,4590.89 27.81,4614.13 37.98,4635.93 51.77,4655.63 68.78,4672.64 88.48,4686.43 110.28,4696.6 133.52,4702.82 157.48,4704.92 181.44,4702.82 204.68,4696.6 226.48,4686.43 246.18,4672.64 263.19,4655.63 276.99,4635.93 287.15,4614.13 293.38,4590.89
  region: 905.51,4704.72 1732.28,4704.72 1732.28,4094.49 905.51,4094.49
  region: 2147.83,2500 2146.01,2479.11 2140.58,2458.86 2131.72,2439.86 2119.7,2422.69 2104.87,2407.86 2087.7,2395.84 2068.7,2386.98 2048.44,2381.55 2027.56,2379.72 2006.67,2381.55 1986.42,2386.98 1967.42,2395.84 1950.25,2407.86 1935.42,2422.69 1923.4,2439.86 1914.54,2458.86 1909.11,2479.11 1907.28,2500 1909.11,2520.89 1914.54,2541.14 1923.4,2560.14 1935.42,2577.31 1950.25,2592.14 1967.42,2604.16 1986.42,2613.02 2006.67,2618.45 2027.56,2620.28 2048.44,2618.45 2068.7,2613.02 2087.7,2604.16 2104.87,2592.14 2119.7,2577.31 2131.72,2560.14 2140.58,2541.14 2146.01,2520.89
  region: 3996.26,196.85 3994.16,172.89 3987.94,149.65 3977.77,127.85 3963.98,108.15 3946.97,91.14 3927.26,77.35 3905.46,67.18 3882.23,60.95 3858.27,58.86 3834.31,60.95 3811.07,67.18 3789.27,77.35 3769.57,91.14 3752.56,108.15 3738.76,127.85 3728.6,149.65 3722.37,172.89 3720.28,196.85 3722.37,220.81 3728.6,244.05 3738.76,265.85 3752.56,285.55 3769.57,302.56 3789.27,316.36 3811.07,326.52 3834.31,332.75 3858.27,334.84 3882.23,332.75 3905.46,326.52 3927.26,316.36 3946.97,302.56 3963.98,285.55 3977.77,265.85 3987.94,244.05 3994.16,220.81
  region: 295.47,157.48 293.38,133.52 287.15,110.28 276.99,88.48 263.19,68.78 246.18,51.77 226.48,37.98 204.68,27.81 181.44,21.58 157.48,19.49 133.52,21.58 110.28,27.81 88.48,37.98 68.78,51.77 51.77,68.78 37.98,88.48 27.81,110.28 21.58,133.52 19.49,157.48 21.58,181.44 27.81,204.68 37.98,226.48 51.77,246.18 68.78,263.19 88.48,276.99 110.28,287.15 133.52,293.38 157.48,295.47 181.44,293.38 204.68,287.15 226.48,276.99 246.18,263.19 263.19,246.18 276.99,226.48 287.15,204.68 293.38,181.44
  region: 7067.13,4566.93 7065.03,4542.97 7058.8,4519.73 7048.64,4497.93 7034.84,4478.23 7017.83,4461.22 6998.13,4447.42 6976.33,4437.26 6953.1,4431.03 6929.13,4428.94 6905.17,4431.03 6881.94,4437.26 6860.14,4447.42 6840.43,4461.22 6823.43,4478.23 6809.63,4497.93 6799.46,4519.73 6793.24,4542.97 6791.14,4566.93 6793.24,4590.89 6799.46,4614.13 6809.63,4635.93 6823.43,4655.63 6840.43,4672.64 6860.14,4686.43 6881.94,4696.6 6905.17,4702.82 6929.13,4704.92 6953.1,4702.82 6976.33,4696.6 6998.13,4686.43 7017.83,4672.64 7034.84,4655.63 7048.64,4635.93 7058.8,4614.13 7065.03,4590.89
  region: 2147.83,4389.76 2146.01,4368.88 2140.58,4348.63 2131.72,4329.63 2119.7,4312.45 2104.87,4297.63 2087.7,4285.6 2068.7,4276.74 2048.44,4271.32 2027.56,4269.49 2006.67,4271.32 1986.42,4276.74 1967.42,4285.6 1950.25,4297.63 1935.42,4312.45 1923.4,4329.63 1914.54,4348.63 1909.11,4368.88 1907.28,4389.76 1909.11,4410.65 1914.54,4430.9 1923.4,4449.9 1935.42,4467.08 1950.25,4481.9 1967.42,4493.93 1986.42,4502.79 2006.67,4508.21 2027.56,4510.04 2048.44,4508.21 2068.7,4502.79 2087.7,4493.93 2104.87,4481.9 2119.7,4467.08 2131.72,4449.9 2140.58,4430.9 2146.01,4410.65
  region: 848.62,4389.76 846.79,4368.88 841.37,4348.63 832.51,4329.63 820.48,4312.45 805.66,4297.63 788.48,4285.6 769.48,4276.74 749.23,4271.32 728.35,4269.49 707.46,4271.32 687.21,4276.74 668.21,4285.6 651.03,4297.63 636.21,4312.45 624.18,4329.63 615.32,4348.63 609.9,4368.88 608.07,4389.76 609.9,4410.65 615.32,4430.9 624.18,4449.9 636.21,4467.08 651.03,4481.9 668.21,4493.93 687.21,4502.79 707.46,4508.21 728.35,4510.04 749.23,4508.21 769.48,4502.79 788.48,4493.93 805.66,4481.9 820.48,4467.08 832.51,4449.9 841.37,4430.9 846.79,4410.65
  region: 314.96,1535.43 629.92,1535.43 629.92,1259.84 314.96,1259.84
GND L3:
  region: 848.62,2500 846.79,2479.11 841.37,2458.86 832.51,2439.86 820.48,2422.69 805.66,2407.86 788.48,2395.84 769.48,2386.98 749.23,2381.55 728.35,2379.72 707.46,2381.55 687.21,2386.98 668.21,2395.84 651.03,2407.86 636.21,2422.69 624.18,2439.86 615.32,2458.86 609.9,2479.11 608.07,2500 609.9,2520.89 615.32,2541.14 624.18,2560.14 636.21,2577.31 651.03,2592.14 668.21,2604.16 687.21,2613.02 707.46,2618.45 728.35,2620.28 749.23,2618.45 769.48,2613.02 788.48,2604.16 805.66,2592.14 820.48,2577.31 832.51,2560.14 841.37,2541.14 846.79,2520.89
  region: 295.47,4566.93 293.38,4542.97 287.15,4519.73 276.99,4497.93 263.19,4478.23 246.18,4461.22 226.48,4447.42 204.68,4437.26 181.44,4431.03 157.48,4428.94 133.52,4431.03 110.28,4437.26 88.48,4447.42 68.78,4461.22 51.77,4478.23 37.98,4497.93 27.81,4519.73 21.58,4542.97 19.49,4566.93 21.58,4590.89 27.81,4614.13 37.98,4635.93 51.77,4655.63 68.78,4672.64 88.48,4686.43 110.28,4696.6 133.52,4702.82 157.48,4704.92 181.44,4702.82 204.68,4696.6 226.48,4686.43 246.18,4672.64 263.19,4655.63 276.99,4635.93 287.15,4614.13 293.38,4590.89
  region: 905.51,4704.72 1732.28,4704.72 1732.28,4094.49 905.51,4094.49
  region: 2147.83,2500 2146.01,2479.11 2140.58,2458.86 2131.72,2439.86 2119.7,2422.69 2104.87,2407.86 2087.7,2395.84 2068.7,2386.98 2048.44,2381.55 2027.56,2379.72 2006.67,2381.55 1986.42,2386.98 1967.42,2395.84 1950.25,2407.86 1935.42,2422.69 1923.4,2439.86 1914.54,2458.86 1909.11,2479.11 1907.28,2500 1909.11,2520.89 1914.54,2541.14 1923.4,2560.14 1935.42,2577.31 1950.25,2592.14 1967.42,2604.16 1986.42,2613.02 2006.67,2618.45 2027.56,2620.28 2048.44,2618.45 2068.7,2613.02 2087.7,2604.16 2104.87,2592.14 2119.7,2577.31 2131.72,2560.14 2140.58,2541.14 2146.01,2520.89
  region: 3996.26,196.85 3994.16,172.89 3987.94,149.65 3977.77,127.85 3963.98,108.15 3946.97,91.14 3927.26,77.35 3905.46,67.18 3882.23,60.95 3858.27,58.86 3834.31,60.95 3811.07,67.18 3789.27,77.35 3769.57,91.14 3752.56,108.15 3738.76,127.85 3728.6,149.65 3722.37,172.89 3720.28,196.85 3722.37,220.81 3728.6,244.05 3738.76,265.85 3752.56,285.55 3769.57,302.56 3789.27,316.36 3811.07,326.52 3834.31,332.75 3858.27,334.84 3882.23,332.75 3905.46,326.52 3927.26,316.36 3946.97,302.56 3963.98,285.55 3977.77,265.85 3987.94,244.05 3994.16,220.81
  region: 295.47,157.48 293.38,133.52 287.15,110.28 276.99,88.48 263.19,68.78 246.18,51.77 226.48,37.98 204.68,27.81 181.44,21.58 157.48,19.49 133.52,21.58 110.28,27.81 88.48,37.98 68.78,51.77 51.77,68.78 37.98,88.48 27.81,110.28 21.58,133.52 19.49,157.48 21.58,181.44 27.81,204.68 37.98,226.48 51.77,246.18 68.78,263.19 88.48,276.99 110.28,287.15 133.52,293.38 157.48,295.47 181.44,293.38 204.68,287.15 226.48,276.99 246.18,263.19 263.19,246.18 276.99,226.48 287.15,204.68 293.38,181.44
  region: 7067.13,4566.93 7065.03,4542.97 7058.8,4519.73 7048.64,4497.93 7034.84,4478.23 7017.83,4461.22 6998.13,4447.42 6976.33,4437.26 6953.1,4431.03 6929.13,4428.94 6905.17,4431.03 6881.94,4437.26 6860.14,4447.42 6840.43,4461.22 6823.43,4478.23 6809.63,4497.93 6799.46,4519.73 6793.24,4542.97 6791.14,4566.93 6793.24,4590.89 6799.46,4614.13 6809.63,4635.93 6823.43,4655.63 6840.43,4672.64 6860.14,4686.43 6881.94,4696.6 6905.17,4702.82 6929.13,4704.92 6953.1,4702.82 6976.33,4696.6 6998.13,4686.43 7017.83,4672.64 7034.84,4655.63 7048.64,4635.93 7058.8,4614.13 7065.03,4590.89
  region: 2147.83,4389.76 2146.01,4368.88 2140.58,4348.63 2131.72,4329.63 2119.7,4312.45 2104.87,4297.63 2087.7,4285.6 2068.7,4276.74 2048.44,4271.32 2027.56,4269.49 2006.67,4271.32 1986.42,4276.74 1967.42,4285.6 1950.25,4297.63 1935.42,4312.45 1923.4,4329.63 1914.54,4348.63 1909.11,4368.88 1907.28,4389.76 1909.11,4410.65 1914.54,4430.9 1923.4,4449.9 1935.42,4467.08 1950.25,4481.9 1967.42,4493.93 1986.42,4502.79 2006.67,4508.21 2027.56,4510.04 2048.44,4508.21 2068.7,4502.79 2087.7,4493.93 2104.87,4481.9 2119.7,4467.08 2131.72,4449.9 2140.58,4430.9 2146.01,4410.65
  region: 848.62,4389.76 846.79,4368.88 841.37,4348.63 832.51,4329.63 820.48,4312.45 805.66,4297.63 788.48,4285.6 769.48,4276.74 749.23,4271.32 728.35,4269.49 707.46,4271.32 687.21,4276.74 668.21,4285.6 651.03,4297.63 636.21,4312.45 624.18,4329.63 615.32,4348.63 609.9,4368.88 608.07,4389.76 609.9,4410.65 615.32,4430.9 624.18,4449.9 636.21,4467.08 651.03,4481.9 668.21,4493.93 687.21,4502.79 707.46,4508.21 728.35,4510.04 749.23,4508.21 769.48,4502.79 788.48,4493.93 805.66,4481.9 820.48,4467.08 832.51,4449.9 841.37,4430.9 846.79,4410.65
  region: 314.96,1535.43 629.92,1535.43 629.92,1259.84 314.96,1259.84
Bottom Layer:
  region: 848.62,2500 846.79,2479.11 841.37,2458.86 832.51,2439.86 820.48,2422.69 805.66,2407.86 788.48,2395.84 769.48,2386.98 749.23,2381.55 728.35,2379.72 707.46,2381.55 687.21,2386.98 668.21,2395.84 651.03,2407.86 636.21,2422.69 624.18,2439.86 615.32,2458.86 609.9,2479.11 608.07,2500 609.9,2520.89 615.32,2541.14 624.18,2560.14 636.21,2577.31 651.03,2592.14 668.21,2604.16 687.21,2613.02 707.46,2618.45 728.35,2620.28 749.23,2618.45 769.48,2613.02 788.48,2604.16 805.66,2592.14 820.48,2577.31 832.51,2560.14 841.37,2541.14 846.79,2520.89
  region: 295.47,4566.93 293.38,4542.97 287.15,4519.73 276.99,4497.93 263.19,4478.23 246.18,4461.22 226.48,4447.42 204.68,4437.26 181.44,4431.03 157.48,4428.94 133.52,4431.03 110.28,4437.26 88.48,4447.42 68.78,4461.22 51.77,4478.23 37.98,4497.93 27.81,4519.73 21.58,4542.97 19.49,4566.93 21.58,4590.89 27.81,4614.13 37.98,4635.93 51.77,4655.63 68.78,4672.64 88.48,4686.43 110.28,4696.6 133.52,4702.82 157.48,4704.92 181.44,4702.82 204.68,4696.6 226.48,4686.43 246.18,4672.64 263.19,4655.63 276.99,4635.93 287.15,4614.13 293.38,4590.89
  region: 905.51,4704.72 1732.28,4704.72 1732.28,4094.49 905.51,4094.49
  region: 2147.83,2500 2146.01,2479.11 2140.58,2458.86 2131.72,2439.86 2119.7,2422.69 2104.87,2407.86 2087.7,2395.84 2068.7,2386.98 2048.44,2381.55 2027.56,2379.72 2006.67,2381.55 1986.42,2386.98 1967.42,2395.84 1950.25,2407.86 1935.42,2422.69 1923.4,2439.86 1914.54,2458.86 1909.11,2479.11 1907.28,2500 1909.11,2520.89 1914.54,2541.14 1923.4,2560.14 1935.42,2577.31 1950.25,2592.14 1967.42,2604.16 1986.42,2613.02 2006.67,2618.45 2027.56,2620.28 2048.44,2618.45 2068.7,2613.02 2087.7,2604.16 2104.87,2592.14 2119.7,2577.31 2131.72,2560.14 2140.58,2541.14 2146.01,2520.89
  region: 3996.26,196.85 3994.16,172.89 3987.94,149.65 3977.77,127.85 3963.98,108.15 3946.97,91.14 3927.26,77.35 3905.46,67.18 3882.23,60.95 3858.27,58.86 3834.31,60.95 3811.07,67.18 3789.27,77.35 3769.57,91.14 3752.56,108.15 3738.76,127.85 3728.6,149.65 3722.37,172.89 3720.28,196.85 3722.37,220.81 3728.6,244.05 3738.76,265.85 3752.56,285.55 3769.57,302.56 3789.27,316.36 3811.07,326.52 3834.31,332.75 3858.27,334.84 3882.23,332.75 3905.46,326.52 3927.26,316.36 3946.97,302.56 3963.98,285.55 3977.77,265.85 3987.94,244.05 3994.16,220.81
  region: 295.47,157.48 293.38,133.52 287.15,110.28 276.99,88.48 263.19,68.78 246.18,51.77 226.48,37.98 204.68,27.81 181.44,21.58 157.48,19.49 133.52,21.58 110.28,27.81 88.48,37.98 68.78,51.77 51.77,68.78 37.98,88.48 27.81,110.28 21.58,133.52 19.49,157.48 21.58,181.44 27.81,204.68 37.98,226.48 51.77,246.18 68.78,263.19 88.48,276.99 110.28,287.15 133.52,293.38 157.48,295.47 181.44,293.38 204.68,287.15 226.48,276.99 246.18,263.19 263.19,246.18 276.99,226.48 287.15,204.68 293.38,181.44
  region: 7067.13,4566.93 7065.03,4542.97 7058.8,4519.73 7048.64,4497.93 7034.84,4478.23 7017.83,4461.22 6998.13,4447.42 6976.33,4437.26 6953.1,4431.03 6929.13,4428.94 6905.17,4431.03 6881.94,4437.26 6860.14,4447.42 6840.43,4461.22 6823.43,4478.23 6809.63,4497.93 6799.46,4519.73 6793.24,4542.97 6791.14,4566.93 6793.24,4590.89 6799.46,4614.13 6809.63,4635.93 6823.43,4655.63 6840.43,4672.64 6860.14,4686.43 6881.94,4696.6 6905.17,4702.82 6929.13,4704.92 6953.1,4702.82 6976.33,4696.6 6998.13,4686.43 7017.83,4672.64 7034.84,4655.63 7048.64,4635.93 7058.8,4614.13 7065.03,4590.89
  region: 2147.83,4389.76 2146.01,4368.88 2140.58,4348.63 2131.72,4329.63 2119.7,4312.45 2104.87,4297.63 2087.7,4285.6 2068.7,4276.74 2048.44,4271.32 2027.56,4269.49 2006.67,4271.32 1986.42,4276.74 1967.42,4285.6 1950.25,4297.63 1935.42,4312.45 1923.4,4329.63 1914.54,4348.63 1909.11,4368.88 1907.28,4389.76 1909.11,4410.65 1914.54,4430.9 1923.4,4449.9 1935.42,4467.08 1950.25,4481.9 1967.42,4493.93 1986.42,4502.79 2006.67,4508.21 2027.56,4510.04 2048.44,4508.21 2068.7,4502.79 2087.7,4493.93 2104.87,4481.9 2119.7,4467.08 2131.72,4449.9 2140.58,4430.9 2146.01,4410.65
  region: 848.62,4389.76 846.79,4368.88 841.37,4348.63 832.51,4329.63 820.48,4312.45 805.66,4297.63 788.48,4285.6 769.48,4276.74 749.23,4271.32 728.35,4269.49 707.46,4271.32 687.21,4276.74 668.21,4285.6 651.03,4297.63 636.21,4312.45 624.18,4329.63 615.32,4348.63 609.9,4368.88 608.07,4389.76 609.9,4410.65 615.32,4430.9 624.18,4449.9 636.21,4467.08 651.03,4481.9 668.21,4493.93 687.21,4502.79 707.46,4508.21 728.35,4510.04 749.23,4508.21 769.48,4502.79 788.48,4493.93 805.66,4481.9 820.48,4467.08 832.51,4449.9 841.37,4430.9 846.79,4410.65
  region: 314.96,1535.43 629.92,1535.43 629.92,1259.84 314.96,1259.84

## Silkscreen, mask and mechanical layers (free items; w line width, h text height)
Top Overlay:
  drawing of 21 lines, arcs and shapes, not listed
  text "USB CM5" at 2024.17,4555.12 h31.5
  text "J200: 2 GND / 1 +15V" at 6220.47,4224.41 h31.5
  text "PICO RP2040" at 2786.22,3449.45 h31.5 r90
  text "WATCHDOG" at 4291.34,3110.24 h35.43
  text "BOOT" at 255.91,2913.39 h35.43
  text "KILL" at 354.33,2263.78 h35.43
  text "CM5" at 1419.21,2231.1 h31.5
  text "ARM" at 5314.96,2007.87 h35.43
  text "BIAS I" at 6850.39,1889.76 h35.43
  text "DAC" at 3346.46,1850.39 h35.43
  text "FOTODIODO" at 551.18,1811.02 h35.43
  text "ADC" at 2440.94,1732.28 h35.43
  text "BIAS Q" at 6850.39,1259.84 h35.43
  text "BIAS PHI" at 6811.02,629.92 h35.43
  text "CM5 PHOTONIC BIAS" at 2047.24,196.85 h51.18
  text "CONTROLE DE BIAS" at 2047.24,78.74 h39.37
Board Outline:
  the board outline again, w1.97
Module Envelopes:
  lines w5.91: 590.55,2362.2 2165.35,2362.2 2165.35,4527.56 590.55,4527.56 590.55,2362.2 ; 2854.33,2578.74 2854.33,4586.61 3681.1,4586.61 3681.1,2578.74 2854.33,2578.74